# Allegro board CNC_Machine_Final_updated.brd
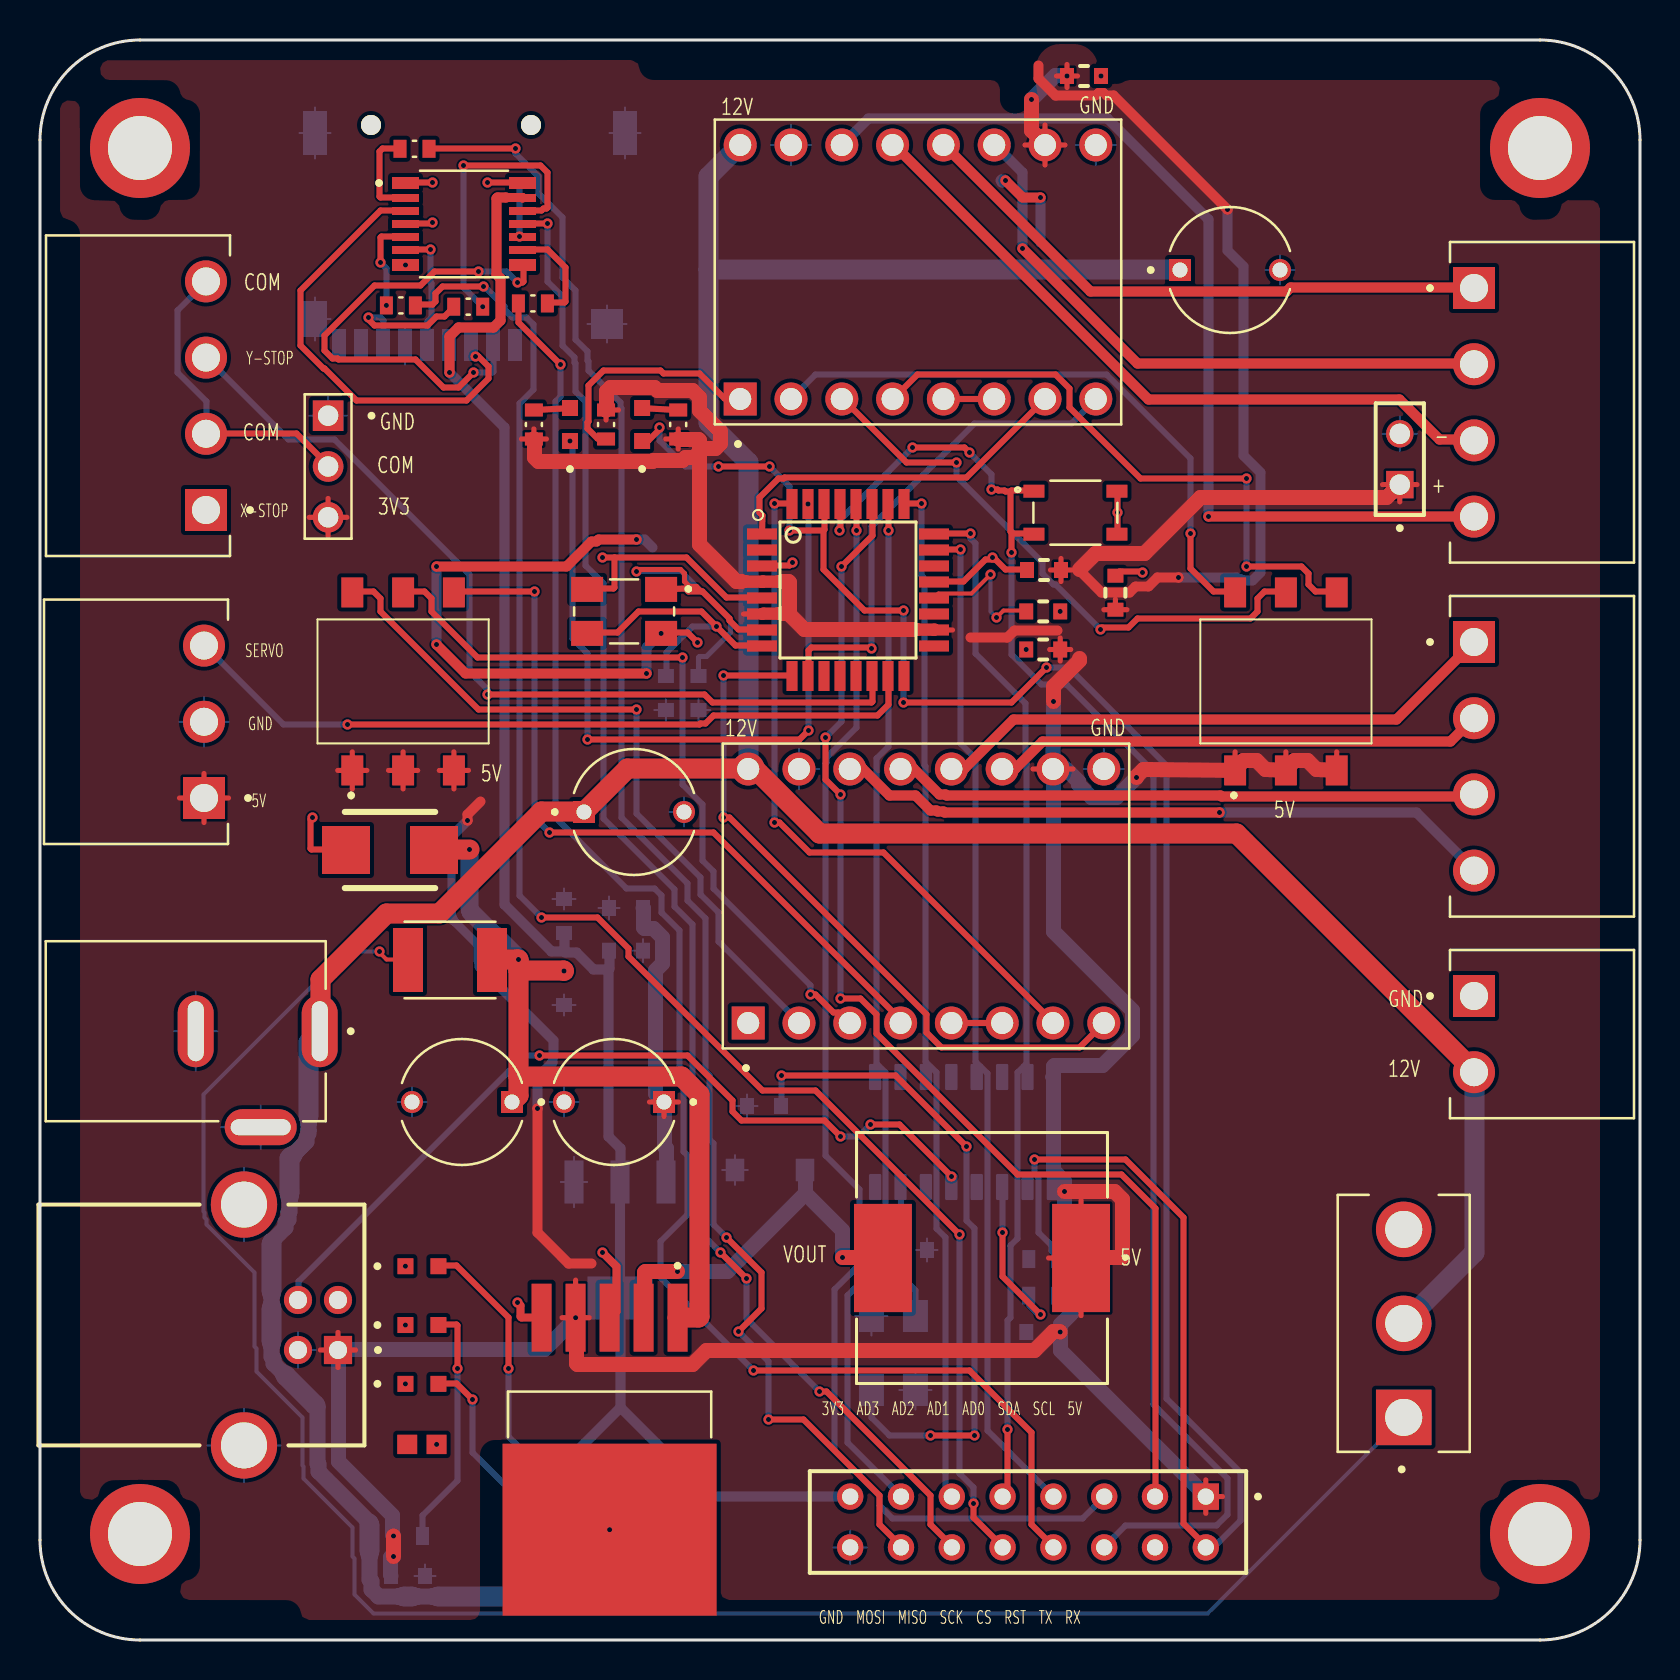
[diagram p0: board, top side]
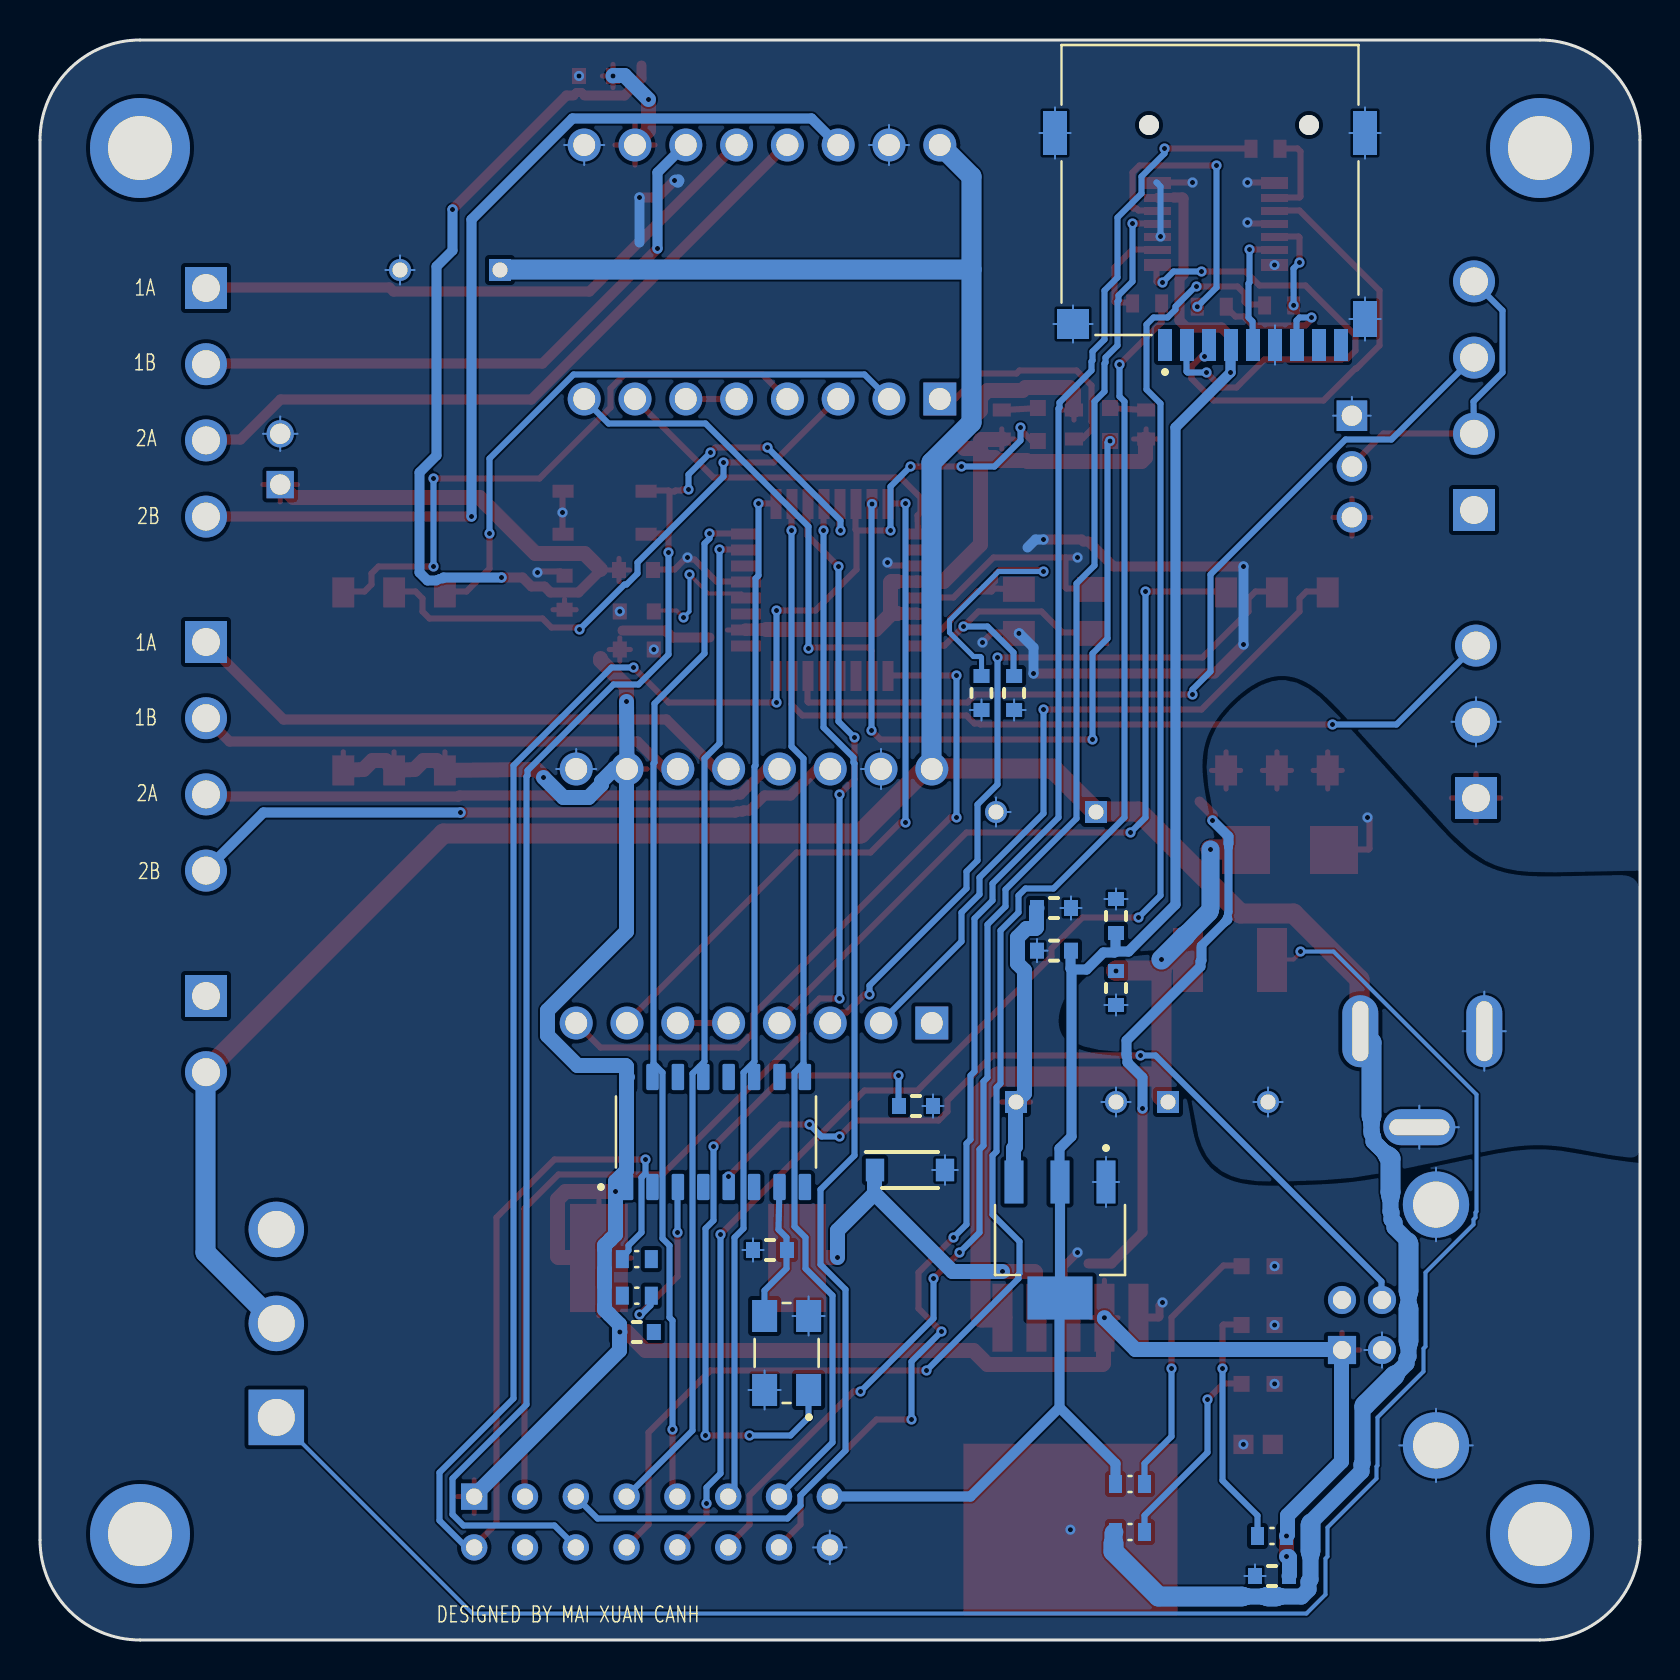
[diagram p1: board, bottom side, seen from below]

Outline 80 x 80 mm; copper layers: TOP, BOTTOM. Coordinates in mm from the lower left corner of the outline.
Outline path: 0,75 0,5 arc(1.46,1.46) 5,0 75,0 arc(78.54,1.46) 80,5 80,75 arc(78.54,78.54) 75,80 5,80 arc(1.46,78.54) 0,75

## Design rules (mm)
constraint set DEFAULT: min track width 0.1
net group USB: nets USB_D+ USB_D-
nets with their own width: min track width 0.254; nets 5V

## Placement (name value [footprint] x y rotation side)
C19  100nF  [WCAP-CSGP_0603_W]  18.4 3.2 180 bottom
C21  10uF  [WCAP-CSGP_0603_W]  26.2 36.2 270 bottom
C22  680uF/25V  [CAPPRD500W50D630H1120]  21.1 26.9 180 top
C23  10uF 0603  [WCAP-CSGP_0603_W]  26.2 32.6 90 bottom
C24  220uF/16V  [CAPPRD500W50D630H1120]  28.7 26.9 180 top
C25  10uF 0603  [WCAP-CSGP_0603_W]  29.3 36.6 0 bottom
C26  100nF  [WCAP-CSGP_0603_W]  29.3 34.47 180 bottom
C27  10uF 0603  [WCAP-CSGP_0603_W]  53.77 52.37 270 top
C28  100nF  0603  [WCAP-CSGP_0603_W]  50.16 49.52 0 top
C29  10uF 0603  [WCAP-CSGP_0603_W]  50.16 15.4 0 bottom
C30  22pF 0603  [WCAP-CSGP_0603_W]  36.2 26.7 0 bottom
C31  22pF 0603  [WCAP-CSGP_0603_W]  43.5 19.5 180 bottom
C32  47uF/50V  [CAPPRD500W50D630H1120]  59.5 68.5 0 top
C33  47uF/50V  [CAPPRD500W50D630H1120]  29.7 41.4 0 top
C34  100nF  [WCAP-CSGP_0603_W]  50.2 53.5 0 top
C35  100nF  [WCAP-CSGP_0603_W]  50.16 51.43 0 top
C36  22pF  [WCAP-CSGP_0603_W]  32.92 47.35 270 bottom
C37  22pF  [WCAP-CSGP_0603_W]  31.3 47.35 270 bottom
C38  100nF  [WCAP-CSGP_0603_W]  52.2 78.2 180 top
D2  0603  [LED_KP-1608SURCK]  19.09 18.69 0 top
D3  0603  [LED_KP-1608SURCK]  19.09 15.75 0 top
D4  0603  [LED_KP-1608SURCK]  19.09 12.81 0 top
D6  1N4007W-T  [SODFL3818X130N]  36.5 23.5 180 bottom
D10  TVS  [SMB_NOPOL]  17.5 39.5 0 top
D11  0603  [LED_KP-1608SURCK]  30.11 60.77 90 top
D12  0603  [LED_KP-1608SURCK]  26.5 60.77 90 top
F1  1812 16V 2.5A  [FUSER_MF-MSMF200]  20.5 34 0 top
FL4  BLM18SG121TN1D  [BEADC1608X65N]  19.09 9.78 0 top
J10  LIMIT SWITCH  [CUI_TBP02R1-381-04BE]  8.3 56.5 90 top
J13  USB_TYPEB  [SAMTEC_USBR-B-S-S-O-TH]  14.9 14.5 270 top
J15  TBP02R1-381-02BE  [CUI_TBP02R1-381-02BE]  71.7 32.2 270 top
J16  FFMD-08-X-X-X  [SAMTEC_IDMD-08-X-X]  49.4 5.9 180 top
J18  MSD-1-A  [CUI_MSD-1-A]  21.5 72.5 0 bottom
J20  X MOTOR  [CUI_TBP02R1-381-04BE]  71.7 49.9 270 top
J21  Y MOTOR  [CUI_TBP02R1-381-04BE]  71.7 67.6 270 top
J22  Z MOTOR  [CUI_TBP02R1-381-03BE]  8.2 42.1 90 top
J25  TMS-101-21-G-S  [SAMTEC_TMS-101-21-G-S]  75 5.3 0 top
J26  TMS-101-21-G-S  [SAMTEC_TMS-101-21-G-S]  5 74.6 0 top
J27  TMS-101-21-G-S  [SAMTEC_TMS-101-21-G-S]  5 5.3 0 top
J31  TMS-101-21-G-S  [SAMTEC_TMS-101-21-G-S]  75 74.6 0 top
J33  SELECT PIN  [TE_5-146281-3]  14.41 58.67 270 top
J34  FAN 5V  [SAMTEC_ESQ-102-48-L-S]  67.99 57.77 90 top
J35  PJ-035D  [CUI_PJ-035D]  13.98 30.44 270 top
L1  33uH  [IND_CDRH127LDNP-470MC_SUM]  47.1 19.1 180 top
NOREF  -  []  5 80 0 top
NOREF#2  -  []  0 5 90 top
R13  1k5  [RESC1508X55N]  25.5 7.8 0 bottom
R14  2k2  [RESC1508X55N]  18.4 5.2 180 bottom
R15  10K  [RESC1508X55N]  25.5 5.4 0 bottom
R16  1K  [RESC1508X55N]  31.91 60.77 270 top
R17  1K  [RESC1508X55N]  24.7 60.77 270 top
R18  1K  [RESC1508X55N]  50.16 19.05 0 bottom
R19  1K  [RESC1508X55N]  50.16 17.21 0 bottom
R20  10K  [RESC1508X55N]  28.3 60.77 90 top
R21  3K3  [RESC1508X55N]  18.73 74.56 0 top
R22  3K3  [RESC1508X55N]  18.05 66.73 0 top
R23  3K3  [RESC1508X55N]  24.64 66.83 180 top
R24  3K3  [RESC1508X55N]  21.41 66.66 180 top
S2  DIP3_X_254  [A6S3104H]  18.16 47.93 0 top
S3  DIP3_Y_254  [A6S3104H]  62.3 47.93 0 top
S4  4.2x3.3mm  [SW_SKRPACE010]  51.77 56.36 0 top
S5  SSP1S1M2  [SW_500SSP1S1M2REA]  68.19 15.83 90 top
U3  CH340G  [SOIC127P600X180-16N]  46.2 25.4 90 bottom
U4  ATMEGA328P-AN  [QFP80P900X900X120-32N]  40.4 52.5 0 top
U14  LM2596SX-12NOPB  [VREG_LM2596SX-12NOPB]  28.48 5.52 270 top
U15  A4988  [DRV8825]  44.3 37.2 90 top
U16  A4988  [DRV8825]  43.9 68.4 90 top
U17  74LVC125APW  [IC_74LVC125APW]  21.2 70.8 0 top
VR3  LM1117MPX-33NOPB  [VREG_LM1117MPX-33NOPB]  29 20 270 bottom
Y5  12Mhz 5032 4 pin  [XTAL_ECS-2712-10-30B-RWY-TR]  42.67 14.35 90 bottom
Y6  16Mhz 5032  [XTAL_ECS-2712-10-30B-RWY-TR]  29.2 51.43 180 top

## Library data of the parts
C19 C21 C23 C25-C31 C34-C38 = GRM033C71C104KE14J_0
C22 C24 C32 C33 = ECEA1EN470UB_0
D2-D4 D11 D12 = KP-1608SURCK
D6 = 1N4007W-T
D10 = ZENER_BIDI
F1 = MF-MSMF200
FL4 = BLM18SG121TN1D
J10 J20 J21 = TBP02R1-381-04BE
J13 = USBR-B-S-S-O-TH
J15 = TBP02R1-381-02BE
J16 = FFMD-08-X-X-X
J18 = MSD-1-A
J22 = TBP02R1-381-03BE
J25-J27 = TMS-101-21-G-S_2
J31 = TMS-101-21-G-S
J33 = 5-146281-3
J34 = ESQ-102-48-L-S
J35 = PJ-035D
L1 = IND
R13-R24 = 6-1879417-7
S2 S3 = A6S-3101-H
S4 = SKRPACE010
S5 = 500SSP1S1M2REA
U3 = CH340G
U4 = ATMEGA328P-AN
U14 = LM2596SX-12NOPB
U15 U16 = A4988
U17 = 74LVC125APW
VR3 = LM1117MPX-33NOPB
Y5 Y6 = ECS-2712-10-30B-RWY-TR

## Footprints (pads in the part's own frame, mm; a bottom-side part is the same pattern mirrored in y, then rotated)
A6S3104H
  rect 1.1x1.5 smd: 1(-2.54,-4.45) 2(-2.54,4.45) 3(0,-4.45) 4(0,4.45) 5(2.54,-4.45) 6(2.54,4.45)
BEADC1608X65N
  rect 1x0.97 smd: 1(-0.735,0) 2(0.735,0)
CAPPRD500W50D630H1120
  round 1.1 hole 0.75: N(2.5,0)
  rect 1.1x1.1 hole 0.75: P(-2.5,0)
CUI_MSD-1-A
  round 1 hole 1 unplated: (-4.95,-3.25) (3.05,-3.25)
  rect 0.7x1.6 smd: 1(2.25,7.75) 2(1.15,7.75) 3(0.05,7.75) 4(-1.05,7.75) 5(-2.15,7.75) 6(-3.25,7.75) 7(-4.35,7.75) 8(-5.45,7.75) CD(-6.55,7.75)
  rect 1.2x1.8 smd: G1(-7.75,6.45)
  rect 1.6x1.5 smd: G2(6.85,6.7)
  rect 1.2x2.2 smd: G3(-7.75,-2.85) G4(7.75,-2.85)
CUI_PJ-035D
  oval 3.6x1.8 hole 3x0.8: 1(0,0) 2(0,-6.2)
  oval 1.8x3.6 hole 0.8x3: 3(4.8,-2.95)
CUI_TBP02R1-381-02BE
  rect 2.1x2.1 hole 1.4: 1(0,0)
  round 2.1 hole 1.4: 2(3.81,0)
CUI_TBP02R1-381-03BE
  rect 2.1x2.1 hole 1.4: 1(0,0)
  round 2.1 hole 1.4: 2(3.81,0) 3(7.62,0)
CUI_TBP02R1-381-04BE
  rect 2.1x2.1 hole 1.4: 1(0,0)
  round 2.1 hole 1.4: 2(3.81,0) 3(7.62,0) 4(11.43,0)
DRV8825
  rect 1.65x1.65 hole 1.1: 1(-6.35,8.89)
  round 1.65 hole 1.1: 2(-6.35,6.35) 3(-6.35,3.81) 4(-6.35,1.27) 5(-6.35,-1.27) 6(-6.35,-3.81) 7(-6.35,-6.35) 8(-6.35,-8.89) 9(6.35,-8.89) 10(6.35,-6.35) 11(6.35,-3.81) 12(6.35,-1.27) 13(6.35,1.27) 14(6.35,3.81) 15(6.35,6.35) 16(6.35,8.89)
FUSER_MF-MSMF200
  rect 1.5x3.2 smd: 1(-2.1,0) 2(2.1,0)
IC_74LVC125APW
  rect 1.35x0.6 smd: 1(-2.925,2.05) 7(-2.925,-2.05) 8(2.925,-2.05) 14(2.925,2.05)
  rect 1.35x0.4 smd: 2(-2.925,1.3) 3(-2.925,0.65) 4(-2.925,0) 5(-2.925,-0.65) 6(-2.925,-1.3) 9(2.925,-1.3) 10(2.925,-0.65) 11(2.925,0) 12(2.925,0.65) 13(2.925,1.3)
IND_CDRH127LDNP-470MC_SUM
  rect 2.896x5.41 smd: 1(-4.953,0) 2(4.953,0)
LED_KP-1608SURCK
  rect 0.8x0.8 smd: 1(0.825,0) 2(-0.825,0)
QFP80P900X900X120-32N
  rect 1.5x0.55 smd: 1(-4.3,2.8) 2(-4.3,2) 3(-4.3,1.2) 4(-4.3,0.4) 5(-4.3,-0.4) 6(-4.3,-1.2) 7(-4.3,-2) 8(-4.3,-2.8) 17(4.3,-2.8) 18(4.3,-2) 19(4.3,-1.2) 20(4.3,-0.4) 21(4.3,0.4) 22(4.3,1.2) 23(4.3,2) 24(4.3,2.8)
  rect 0.55x1.5 smd: 9(-2.8,-4.3) 10(-2,-4.3) 11(-1.2,-4.3) 12(-0.4,-4.3) 13(0.4,-4.3) 14(1.2,-4.3) 15(2,-4.3) 16(2.8,-4.3) 25(2.8,4.3) 26(2,4.3) 27(1.2,4.3) 28(0.4,4.3) 29(-0.4,4.3) 30(-1.2,4.3) 31(-2,4.3) 32(-2.8,4.3)
RESC1508X55N
  rect 0.65x0.9 smd: 1(-0.725,0) 2(0.725,0)
SAMTEC_ESQ-102-48-L-S
  rect 1.37x1.37 hole 1.02: 01(0,0)
  round 1.37 hole 1.02: 02(2.54,0)
SAMTEC_IDMD-08-X-X
  rect 1.318x1.318 hole 0.81: 01(-8.89,-1.27)
  round 1.318 hole 0.81: 02(-8.89,1.27) 03(-6.35,-1.27) 04(-6.35,1.27) 05(-3.81,-1.27) 06(-3.81,1.27) 07(-1.27,-1.27) 08(-1.27,1.27) 09(1.27,-1.27) 10(1.27,1.27) 11(3.81,-1.27) 12(3.81,1.27) 13(6.35,-1.27) 14(6.35,1.27) 15(8.89,-1.27) 16(8.89,1.27)
SAMTEC_TMS-101-21-G-S
  round 5 hole 3.2: 03(0,0)
SAMTEC_USBR-B-S-S-O-TH
  rect 1.408x1.408 hole 0.9: 1(0,0)
  round 1.408 hole 0.9: 2(-2.5,0) 3(-2.5,-2) 4(0,-2)
  round 3.316 hole 2.3: S1(4.77,-4.7) S2(-7.27,-4.7)
SMB_NOPOL
  rect 2.4x2.4 smd: A(2.2,0) C(-2.2,0)
SODFL3818X130N
  rect 0.92x1.13 smd: 1(-1.75,0) 2(1.75,0)
SOIC127P600X180-16N
  custom 1.31x0.62 smd: 1(-2.75,4.445) 2(-2.75,3.175) 3(-2.75,1.905) 4(-2.75,0.635) 5(-2.75,-0.635) 6(-2.75,-1.905) 7(-2.75,-3.175) 8(-2.75,-4.445) 9(2.75,-4.445) 10(2.75,-3.175) 11(2.75,-1.905) 12(2.75,-0.635) 13(2.75,0.635) 14(2.75,1.905) 15(2.75,3.175) 16(2.75,4.445)
SW_500SSP1S1M2REA
  rect 2.775x2.775 hole 1.85: 1(-4.7,0)
  round 2.775 hole 1.85: 2(0,0) 3(4.7,0)
SW_SKRPACE010
  rect 1.05x0.65 smd: 1(-2.075,1.075) 2(2.075,1.075) 3(-2.075,-1.075) 4(2.075,-1.075)
TE_5-146281-3
  rect 1.53x1.53 hole 1.02: 1(-2.54,0)
  round 1.53 hole 1.02: 2(0,0) 3(2.54,0)
VREG_LM1117MPX-33NOPB
  rect 2.15x0.95 smd: 1(-2.9,2.3) 2(-2.9,0) 3(-2.9,-2.3)
  rect 2.15x3.25 smd: 4(2.9,0)
VREG_LM2596SX-12NOPB
  rect 3.4x1 smd: 1(-10.6,3.4) 2(-10.6,1.7) 3(-10.6,0) 4(-10.6,-1.7) 5(-10.6,-3.4)
  rect 8.6x10.7 smd: 6(0,0)
WCAP-CSGP_0603_W
  rect 0.7x0.8 smd: 1(-0.85,0) 2(0.85,0)
XTAL_ECS-2712-10-30B-RWY-TR
  rect 1.6x1.25 smd: 1(-1.85,-1.1) 2(1.85,-1.1) 3(1.85,1.1) 4(-1.85,1.1)

## Nets
3V3: C21.2 C26.2 J16.15 J18.4 R13.2 U17.13(VCC) VR3.2 VR3.4(VOUT_4)
5V: C19.2 C24.P C25.2 C27.2 C28.2 C29.2 C34.2 C38.2 J13.1(VCC) J16.01 J22.1 J33.3 J34.01 L1.1 R14.2 R16.2 R17.2 R20.2 S2.1 S2.3 S2.5 S3.1 S3.3 S3.5 U3.16 U4.4 U4.6(VCC#6) U4.18 U14.4 U15.10 U16.10 VR3.3
12V: C32.P C33.P J15.2 J35.1 R15.2 S5.2 U15.16(VMOT) U16.16(VMOT)
GND: C19.1 C21.1 C24.N C25.1 C26.1 C27.1 C28.1 C30.1 C31.1 C32.N C33.N C34.1 C35.2 C36.2 C37.2 C38.1 D2.2(C) D3.2(C) D4.2(C) D6.2 FL4.2 J13.4 J13.S1 J13.S2 J16.16 J18.6(VSS) J18.G1 J18.G2 J18.G3 J18.G4 J22.2 J33.1 J34.02 S4.2 S4.4 U3.1 U4.3 U4.5 U4.21 U14.3 U14.5 U14.6 U15.9 U15.15 U16.9 U16.15 U17.1 U17.4 U17.7 U17.10 U17.14 VR3.1 Y5.2 Y5.4 Y6.2 Y6.4
VIN: C22.P C23.2 D10.A F1.2 U14.1(VIN)
1A: J20.1 U15.12
1A_2: J21.1 U16.12
1B: J20.2 U15.11
1B_2: J21.2 U16.11
2A: J20.3 U15.13
2A_2: J21.3 U16.13
2B: J20.4 U15.14
2B_2: J21.4 U16.14
AD0: J16.07 U4.23
AD1: J16.09 U4.24
AD2: J16.11 U4.25
AD3: J16.13 U4.26
AD6: U4.19
AD7: U4.22
CS: J16.08 R23.2
CS_LLS: J18.2 U17.8
DI_LLS: J18.3 U17.3
DO_LLS: J18.7 R24.2
H_GND: C22.N C23.1 D10.C(2) FL4.1 J15.1 J35.2 J35.3
IO2: U4.32 U15.7
IO3: U4.1 U16.7
IO4: U4.2
IO5: U4.9 U15.8
IO6: U4.10 U16.8
IO7: U4.11
IO8: R20.1 U4.12 U15.1 U16.1
IO9: J10.1 U4.13
IO10: J10.3 U4.14
IO11: J22.3 U4.15
IO12: U4.16
IO13: U4.17
MISO: J16.12 U17.11
MOSI: J16.14 R21.2
MS1_X: S2.2 U15.2
MS1_Y: S3.2 U16.2
MS2_X: S2.4 U15.3
MS2_Y: S3.4 U16.3
MS3_X: S2.6(NO_3) U15.4
MS3_Y: S3.6(NO_3) U16.4
RST: J16.06 S4.1 S4.3 U4.29
SCK: J16.10 R22.2
SCK_LLS: J18.5 U17.6
SCL: J16.03 U4.27
SDA: J16.05 U4.28
USB_D+: J13.3 U3.5
USB_D-: J13.2 U3.6
USB_RX: D11.2(C) J16.02 R18.2 U4.30
USB_TX: D12.2(C) J16.04 R19.2 U4.31
VOUT: D6.1(K) L1.2 U14.2
XI: C31.2 U3.7 Y5.3(OUT/IN)
XO: C30.2 U3.8(XO) Y5.1
XTAL1: C36.1 U4.7 Y6.1
XTAL2: C37.1 U4.8 Y6.3(OUT/IN)
N159792: D2.1 R13.1
N159937: D3.1 R14.1
N160078: D4.1 R15.1
N168314: C29.1 U3.4
N169273: D11.1 R16.1
N169321: D12.1 R17.1
N170907: R19.1 U3.3
N170909: R18.1 U3.2
N174721: U15.5 U15.6
N176018: U16.5 U16.6
N177002: J10.2 J10.4 J33.2
N180451: C35.1 U4.20
N1623340: F1.1 S5.1
N2014051: R21.1 U17.2
N2014054: R22.1 U17.5
N2014058: R23.1 U17.9
N20140511: R24.1 U17.12

Pads without a net: J18 1 8 CD; J25 03; J26 03; J27 03; J31 03; S5 3; U3 9 10 11 12 13 14 15

## Via types
v1: diameter 0.508, hole 0.254, TOP to BOTTOM, 137 vias

## Routing (per net, layer and track width the routed paths; a pad name or vN(x,y) marks a point on that pad's centre or on a via; arc(x,y) is an arc through that point)
3V3: length 90.3
  TOP w0.449: U17.13 24.13,72.1 24.12,72.12 23.43,72.12
  TOP w0.452: 23.43,72.12 23.38,72.12
  TOP w0.464: 23.38,72.12 23.32,72.12
  TOP w0.488: 23.32,72.12 23.27,72.12
  TOP w0.508: 23.27,72.12 22.88,72.12 22.82,72.08 22.82,68.28 23.02,68.08 23.02,65.97 22.68,65.62 20.93,65.62 20.48,65.17 v1(20.48,63.38)
  BOTTOM w0.508: VR3.2 29,22.9 ; 29,22.9 29.02,22.98 29.02,24.57 28.43,25.18 28.43,33.52 ; 29,22.9 VR3.4 29,17.1 29.02,17.12 29.02,11.62 ; 26.23,34.42 26.23,35.33 C21.2 ; 26.23,34.42 26.27,34.38 26.82,34.38 27.68,33.52 28.43,33.52 ; 26.23,34.42 25.57,34.42 23.23,36.77 23.23,60.62 v1(20.48,63.38) 20.48,64.72 20.45,64.75 J18.4 ; 28.43,33.52 28.48,33.58 28.48,34.42 28.45,34.47 C26.2 ; J16.15 40.51,7.17 40.48,7.17 33.48,7.17 29.02,11.62 ; 29.02,11.62 26.23,8.82 R13.2
5V: length 353.6
  TOP w0.254: 43.77,50.5 U4.18 45.63,50.5 ; 37.03,51.3 U4.6 35.17,51.3 ; C28.2 51.54,49.52 ; C28.2 50.48,49.52 ; C28.2 51.01,50.1 ; C28.2 51.01,48.95 ; 50.43,19.1 L1.1 ; L1.1 52.05,21.98 ; L1.1 52.05,16.22 ; S2.3 18.88,43.48 ; S2.3 17.43,43.48 ; S2.3 18.16,44.41 ; S2.3 18.16,42.55 ; 50.82,78.2 v1(51.35,78.2) ; v1(51.35,78.2) 51.35,77.62 ; v1(51.35,78.2) 51.88,78.2 ; v1(51.35,78.2) 51.35,78.78 ; 6.97,42.1 J22.1 ; J22.1 8.2,40.87 ; J22.1 8.2,43.33 ; J22.1 9.43,42.1 ; 53.19,51.52 C27.2 ; C27.2 53.77,52.04 ; C27.2 54.35,51.52 ; 28.3,61 R20.2 ; R20.2 28.3,62 ; R20.2 28.93,61.5 ; 14.9,13.62 J13.1 ; J13.1 14.9,15.38 ; J13.1 15.78,14.5 ; J13.1 14.02,14.5 ; R17.2 24.7,60.55 ; R17.2 25.32,60.05 ; R17.2 24.7,59.55 ; R17.2 24.07,60.05 ; J16.01 59.13,7.17 ; J16.01 58.29,8.01 ; J16.01 58.29,6.33 ; C34.2 51.58,53.5 ; C34.2 50.52,53.5 ; C34.2 51.05,52.92 ; C34.2 51.05,54.08 ; R16.2 32.54,60.05 ; R16.2 31.91,60.55 ; R16.2 31.28,60.05 ; R16.2 31.91,59.55 ; 62.3,44.41 S3.3 61.57,43.48 ; 19.97,43.48 S2.5 ; S2.5 21.42,43.48 ; S2.5 20.7,44.41 ; S2.5 20.7,42.55 ; 14.41,55.19 J33.3 ; J33.3 13.46,56.14 ; J33.3 14.41,57.08 ; J33.3 15.35,56.14 ; S2.1 15.61,44.41 ; S2.1 15.61,42.55 ; S2.1 16.34,43.48 ; S2.1 14.89,43.48 ; 51.65,43.55 U15.10 49.65,43.55 ; 30.47,26.9 C24.P ; C24.P 31.93,26.9 ; C24.P 31.2,26.17 ; 26.78,14.24 v1(26.78,16.11) ; v1(26.78,16.11) 27.46,16.11 ; v1(26.78,16.11) 26.78,17.99 ; v1(26.78,16.11) 26.1,16.11 ; 37.03,52.9 U4.4 35.17,52.9 ; 59.75,44.41 S3.1 59.03,43.48 ; 64.11,43.48 S3.5 64.84,44.41 ; 67.99,56.91 J34.01 ; J34.01 68.85,57.77 ; J34.01 67.13,57.77 ; U16.10 50.25,75.75 ; U16.10 49.25,74.75 ; U16.10 51.25,74.75 ; U16.10 50.25,73.75
  TOP w0.449: 53.33,77.22 53.17,77.38 52.92,77.38 52.77,77.22
  TOP w0.492: 54.77,52.67 55.42,52.67
  TOP w0.5: v1(24.88,26.57) 24.88,20.38 26.43,18.82 27.57,18.82 ; 53.33,77.22 53.67,77.22 v1(59.38,71.53) ; 22.02,41.92 21.38,41.27 v1(21.38,40.98) ; 55.42,52.67 55.88,53.12 v1(56.92,53.12) ; 46.52,50.12 48.38,50.12 48.73,50.48 50.88,50.48 ; 54.77,52.67 54.48,52.38 53.08,52.38 52.02,53.42 ; 52.77,77.22 50.77,77.22 49.92,78.08 49.92,78.72
  TOP w0.6: U4.18 44.73,50.52 43.92,50.52 ; 36.88,52.92 36.17,52.92 U4.4 36.12,52.92 35.33,52.92 ; 36.88,51.33 36.17,51.33 U4.6
  TOP w0.601: 35.33,52.92 35.27,52.92 ; 36.92,51.33 36.88,51.33 ; 43.88,50.52 43.92,50.52 ; 36.88,52.92 36.92,52.92
  TOP w0.611: 36.92,52.92 36.98,52.92 ; 43.83,50.52 43.88,50.52 ; 36.98,51.33 36.92,51.33 ; 35.27,52.92 35.23,52.92
  TOP w0.63: 43.77,50.52 43.83,50.52 ; 35.23,52.92 35.17,52.92 ; 36.98,52.92 37.02,52.92 ; 37.02,51.33 36.98,51.33
  TOP w0.659: 43.73,50.52 43.77,50.52 ; 37.08,51.33 37.02,51.33 ; 37.02,52.92 37.08,52.92 ; 35.17,52.92 35.12,52.92
  TOP w0.696: 35.12,52.92 35.08,52.92 ; 37.08,52.92 37.12,52.92 ; 37.12,51.33 37.08,51.33 ; 43.67,50.52 43.73,50.52
  TOP w0.741: 35.08,52.92 35.02,52.92 ; 43.62,50.52 43.67,50.52 ; 37.17,51.33 37.12,51.33 ; 37.12,52.92 37.17,52.92
  TOP w0.75: R20.2 28.3,61.5 28.32,61.58 28.32,62.42 28.52,62.62 30.73,62.62 30.88,62.48 32.62,62.48 32.98,62.12 32.98,61.48 34.02,60.42 34.02,59.83 33.77,59.58 32.98,59.58 ; 37.48,51.27 38.23,50.52 43.62,50.52 ; 37.48,51.27 37.42,51.33 37.17,51.33 ; 37.48,51.27 37.48,52.88 37.42,52.92 37.17,52.92 ; J34.01 67.99,57.77 67.33,57.12 58.02,57.12 55.23,54.33 52.77,54.33 51.98,53.52 ; 32.98,59.58 32.98,59.98 32.92,60.02 31.98,60.02 31.91,60.05 R16.2 ; 32.98,59.58 32.98,59.17 ; L1.1 52.06,19.1 52.12,19.12 54.08,19.12 54.12,19.18 54.12,22.02 53.73,22.43 v1(51.23,22.43) ; R17.2 24.7,60.05 24.73,60.02 24.73,59.12 24.93,58.92 30.62,58.92 30.68,58.98 32.12,58.98 32.27,59.12 32.67,59.12 32.73,59.17 32.98,59.17 ; 32.98,59.17 32.98,54.77 34.83,52.92 35.02,52.92 ; S3.5 64.84,43.48 63.83,43.52 63.38,43.98 62.73,43.98 62.3,43.48 61.27,43.52 60.83,43.98 60.17,43.98 59.76,43.48 55.17,43.52 54.83,43.17 v1(54.83,43.12) ; v1(49.58,77.03) 49.58,75.47 50.23,74.83 U16.10 ; v1(50.67,46.92) 50.67,47.67 51.98,48.98 51.98,49.08 ; v1(26.78,16.11) 26.82,16.07 26.82,13.82 26.88,13.77 32.62,13.77 33.33,14.48 49.73,14.48 50.67,15.43 50.98,15.43 v1(51.01,15.4) ; v1(17.68,5.2) v1(17.68,4.17)
  BOTTOM w0.326: 20.57,36.38 20.62,36.33 20.62,36.27
  BOTTOM w0.347: 20.62,36.27 20.62,36.23
  BOTTOM w0.372: 20.62,36.23 20.62,36.17
  BOTTOM w0.4: 20.57,39.58 20.57,36.42
  BOTTOM w0.403: 20.57,39.62 20.57,39.58 ; 20.57,36.42 20.57,36.38 ; 20.62,36.17 20.62,36.12
  BOTTOM w0.407: 25.68,29.18 25.62,29.12 25.62,29.07
  BOTTOM w0.411: 20.57,39.67 20.57,39.62
  BOTTOM w0.425: 20.57,39.73 20.57,39.67
  BOTTOM w0.426: 25.62,29.07 25.62,29.02
  BOTTOM w0.433: 59.88,53.08 60.02,53.08 60.08,53.02
  BOTTOM w0.438: 20.62,36.12 20.62,36.08 ; 21.93,34.67 21.93,34.73 20.77,35.88
  BOTTOM w0.444: 20.57,39.77 20.57,39.73 ; 20.73,35.92 20.77,35.88
  BOTTOM w0.452: 25.62,29.02 25.62,28.98 ; 60.08,53.02 60.12,53.02 60.17,52.98
  BOTTOM w0.461: 20.68,35.98 20.73,35.92
  BOTTOM w0.468: 20.57,39.83 20.57,39.77
  BOTTOM w0.48: 20.62,36.08 20.62,36.02
  BOTTOM w0.485: 25.62,28.98 25.62,28.93
  BOTTOM w0.487: 20.62,36.02 20.68,35.98
  BOTTOM w0.491: 60.17,52.98 60.62,52.98 ; 25.68,29.27 25.68,29.18 ; 61.02,53.38 61.02,58.38
  BOTTOM w0.495: 25.68,29.32 25.68,29.27
  BOTTOM w0.498: 20.57,39.88 20.57,39.83
  BOTTOM w0.5: v1(59.38,71.53) 59.38,69.47 60.17,68.67 60.17,59.23 61.02,58.38 ; 60.62,52.98 61.02,53.38 ; 25.62,28.93 25.62,28.88 24.88,28.12 v1(24.88,26.57) ; 59.88,53.08 59.83,53.12 v1(56.92,53.12) ; 20.57,39.88 20.57,40.17 v1(21.38,40.98) ; 25.68,29.32 25.68,29.98 21.98,33.67 21.98,33.92 21.93,33.98 21.93,34.67
  BOTTOM w0.717: 51.62,19.88 51.58,19.93
  BOTTOM w0.718: 51.67,19.82 51.62,19.88
  BOTTOM w0.72: 51.58,19.93 51.52,19.98
  BOTTOM w0.729: 51.77,18.57 51.77,19.52 ; 51.77,16.73 51.77,17.68
  BOTTOM w0.73: 51.77,17.68 51.77,17.73
  BOTTOM w0.731: 51.58,16.32 51.62,16.38 ; 51.77,18.52 51.77,18.57 ; 51.77,19.52 51.77,19.57
  BOTTOM w0.732: 51.62,16.38 51.67,16.43 ; 51.77,16.68 51.77,16.73
  BOTTOM w0.734: 51.73,19.77 51.67,19.82
  BOTTOM w0.735: 51.52,16.27 51.58,16.32
  BOTTOM w0.737: 51.77,17.73 51.77,17.77
  BOTTOM w0.739: 51.52,19.98 51.48,20.02 ; 51.77,19.57 51.77,19.62 ; 51.77,18.48 51.77,18.52
  BOTTOM w0.742: 51.77,16.62 51.77,16.68
  BOTTOM w0.746: 51.67,16.43 51.73,16.48
  BOTTOM w0.75: v1(26.78,16.11) 26.77,16.07 25.23,14.52 14.98,14.52 J13.1 14.93,14.48 14.93,8.93 17.62,6.23 17.62,5.27 v1(17.68,5.2) ; 51.52,16.27 51.02,15.77 v1(51.01,15.4) 51.02,15.43 51.02,14.48 58.27,7.23 58.28,7.17 J16.01 ; C24.P 31.2,26.9 ; 31.2,26.9 30.77,27.32 30.77,33.48 31.12,33.83 31.12,35.12 30.68,35.58 30.23,35.58 30.18,35.62 30.18,36.58 C25.2 ; 31.2,26.9 31.23,26.88 31.23,24.68 31.32,24.57 31.32,22.98 31.3,22.9 VR3.3 ; 51.77,19.62 51.77,19.73 51.73,19.77 ; 51.77,17.77 51.77,18.48 ; v1(17.68,4.17) 17.57,4.17 17.52,4.12 17.52,3.27 C19.2 ; U15.10 50.67,43.52 50.67,35.42 54.62,31.48 54.62,30.23 53.12,28.73 50.73,28.73 50.67,28.68 50.67,28.23 50.65,28.15 U3.16 50.67,28.18 50.67,23.48 51.23,22.93 v1(51.23,22.43) 51.23,20.27 51.48,20.02 ; U15.10 v1(50.67,46.92) ; U15.10 51.27,43.58 51.92,42.92 51.92,42.77 52.58,42.12 53.83,42.12 v1(54.83,43.12) ; 51.73,16.48 51.77,16.52 51.77,16.62 ; v1(49.58,77.03) 50.77,78.22 51.33,78.22 v1(51.35,78.2)
12V: length 184.3
  TOP w1: J35.1 14.02,30.52 14.02,33.02 17.32,36.33 19.98,36.33 25.07,41.42 27.23,41.42 27.2,41.4 ; 27.2,41.4 27.27,41.48 29.38,43.58 35.38,43.58 U15.16 35.73,43.58 38.98,40.33 59.83,40.33 71.67,28.48 71.7,28.38 J15.2 ; 27.2,41.4 C33.P
  BOTTOM w0.701: 13.38,25.27 13.32,25.23 13.32,25.18
  BOTTOM w0.731: 13.32,25.18 13.32,25.12
  BOTTOM w0.764: 13.32,25.12 13.32,25.07
  BOTTOM w0.771: 13.43,25.32 13.38,25.27
  BOTTOM w0.776: 13.02,24.62 12.98,24.57
  BOTTOM w0.777: 12.98,24.57 12.93,24.52
  BOTTOM w0.779: 13.07,24.68 13.02,24.62
  BOTTOM w0.78: 13.43,25.68 13.43,25.57
  BOTTOM w0.781: 13.43,25.73 13.43,25.68
  BOTTOM w0.782: 12.93,24.52 12.88,24.48 ; 13.43,25.57 13.43,25.52
  BOTTOM w0.784: 13.43,25.77 13.43,25.73 ; R15.2 26.27,5.42 26.32,5.38
  BOTTOM w0.785: 11.62,14.12 11.68,14.07 11.68,14.02
  BOTTOM w0.787: 13.12,24.73 13.07,24.68
  BOTTOM w0.789: 13.43,25.52 13.43,25.48
  BOTTOM w0.792: 13.43,25.82 13.43,25.77
  BOTTOM w0.794: 12.88,24.48 12.82,24.43
  BOTTOM w0.798: 13.43,25.48 13.43,25.43
  BOTTOM w0.8: 18.82,2.17 19.68,2.17 ; 13.12,24.73 13.32,24.93 13.32,25.07 ; 12.18,13.32 11.68,13.82 11.68,14.02 ; 17.98,2.17 16.93,2.17 16.57,2.52 16.57,2.92 16.48,3.02 16.48,4.23 ; 16.48,5.88 13.93,8.43 13.93,8.77 13.88,8.82 13.88,11.62 13.82,11.68 ; 11.57,17.23 11.57,16.77 ; 12.82,24.43 12.73,24.32 ; 11.57,14.73 11.57,14.18 11.62,14.12 ; 11.57,19.93 12.27,20.62 12.27,20.88 12.43,21.02 12.43,21.38 12.48,21.43 12.48,22.07 ; 13.43,25.43 13.43,25.32
  BOTTOM w0.803: 13.43,25.88 13.43,25.82
  BOTTOM w0.817: 13.43,25.93 13.43,25.88
  BOTTOM w0.834: 13.43,25.98 13.43,25.93
  BOTTOM w0.854: 13.43,26.02 13.43,25.98
  BOTTOM w0.858: 18.77,2.17 18.82,2.17 ; 19.68,2.17 19.73,2.17 ; 17.98,2.17 18.02,2.17
  BOTTOM w0.868: 12.73,24.32 12.68,24.27 ; 26.32,5.33 26.32,5.38
  BOTTOM w0.87: 16.48,4.27 16.48,4.23 ; 11.57,14.77 11.57,14.73 ; 11.57,17.27 11.57,17.23 ; 12.48,22.12 12.48,22.07 ; 11.57,16.77 11.57,16.73
  BOTTOM w0.874: 19.73,2.17 19.77,2.17 ; 18.02,2.17 18.07,2.17 ; 18.73,2.17 18.77,2.17
  BOTTOM w0.877: 13.43,26.07 13.43,26.02
  BOTTOM w0.884: 16.48,5.88 16.48,5.83 ; 11.57,19.93 11.57,19.88
  BOTTOM w0.889: 12.48,22.18 12.48,22.12
  BOTTOM w0.898: 11.57,16.73 11.57,16.68 ; 11.57,14.82 11.57,14.77 ; 18.68,2.17 18.73,2.17 ; 19.77,2.17 19.82,2.17 ; 11.57,17.32 11.57,17.27 ; 13.77,11.73 13.82,11.68 ; 12.18,13.32 12.23,13.27 ; 18.07,2.17 18.12,2.17
  BOTTOM w0.9: 12.48,22.32 12.48,22.18 ; 12.23,13.27 12.27,13.23 ; 11.57,16.68 11.57,16.57 ; 18.62,2.17 18.68,2.17 ; 11.57,17.43 11.57,17.32 ; 16.48,4.42 16.48,4.27 ; 11.57,19.88 11.57,19.82 ; 26.32,4.88 26.32,5.33 ; 16.48,5.83 16.48,5.77 ; 18.12,2.17 18.18,2.17 ; 12.68,24.27 12.62,24.23 ; 19.82,2.17 19.88,2.17 ; 11.57,14.93 11.57,14.82
  BOTTOM w0.904: 13.43,26.12 13.43,26.07
  BOTTOM w0.934: 13.43,26.18 13.43,26.12
  BOTTOM w0.948: 12.62,24.23 12.57,24.18
  BOTTOM w0.965: 18.18,2.17 18.23,2.17 ; 19.88,2.17 19.93,2.17 ; 18.57,2.17 18.62,2.17
  BOTTOM w0.966: 13.43,26.23 13.43,26.18
  BOTTOM w0.967: 12.48,22.38 12.48,22.32
  BOTTOM w0.97: 11.57,16.57 11.57,16.52 ; 11.57,19.82 11.57,19.77 ; 16.48,5.77 16.48,5.73 ; 11.57,14.98 11.57,14.93 ; 16.48,4.48 16.48,4.42 ; 26.32,4.83 26.32,4.88 ; 11.57,17.48 11.57,17.43
  BOTTOM w0.992: 12.48,22.43 12.48,22.38
  BOTTOM w0.997: 12.57,24.18 12.52,24.12 ; 13.73,11.77 13.77,11.73
  BOTTOM w0.998: 12.27,13.23 12.32,13.18
  BOTTOM w1: 12.52,24.12 12.48,24.07 12.48,22.43 ; 13.43,26.23 13.43,29.88 J35.1 ; 33.42,68.53 33.42,60.88 35.42,58.88 35.42,43.62 U15.16 ; 33.42,68.53 56.98,68.53 57,68.5 C32.P ; 33.42,68.53 33.42,73.17 34.98,74.72 U16.16 ; 18.23,2.17 18.57,2.17 ; J15.2 71.7,28.38 71.72,28.38 71.72,19.38 68.28,15.93 68.18,15.83 S5.2 ; 12.32,13.18 13.73,11.77 ; 16.48,5.73 16.48,4.48 ; 26.32,4.83 26.32,4.42 24.07,2.17 19.93,2.17 ; 11.57,16.52 11.57,14.98 ; 11.57,19.77 11.57,17.48
GND: length 167.4
  TOP w0.305: U4.3 36.17,53.73 37.48,53.73 v1(37.62,53.88) ; 47.77,54.02 47.27,54.02 46.17,52.92 44.77,52.92 U4.21 ; 47.77,54.02 48.27,53.52 49.33,53.52 C34.1 ; 47.77,54.02 47.67,54.12 v1(47.62,54.12) ; 28.73,54.12 v1(28.12,54.12) ; 28.73,54.12 32.33,54.12 34.33,52.12 36.08,52.12 U4.5 ; 28.73,54.12 28.73,52.62 28.68,52.58 27.43,52.58 27.36,52.53 Y6.2 ; U17.14 24.13,72.85 24.12,72.88 v1(22.38,72.88) ; v1(19.62,70.88) 19.57,70.83 18.38,70.83 18.28,70.8 U17.4 ; v1(18.27,68.75) 18.28,68.75 ; v1(23.98,70.17) 24.13,70.15 U17.10 ; v1(32.88,49.88) 32.38,50.38 31.12,50.38 v1(31.05,50.33) ; v1(19.62,72.88) 18.38,72.88 18.28,72.85 U17.1 ; v1(55.12,53.38) 55.08,53.42 53.98,53.42 53.77,53.22 C27.1 ; S4.4 53.84,55.28 53.88,55.38 v1(53.88,56.38) 53.88,57.42 53.84,57.44 S4.2
  TOP w0.4: U14.5 25.08,16.11 25.07,16.12 24.07,16.12 24.02,16.18 24.02,16.73 v1(23.88,16.88) ; v1(28.12,19.38) 28.82,18.68 28.82,16.43 28.48,16.11 U14.3
  TOP w0.5: v1(50.02,72.12) 49.12,72.12 v1(48.27,72.97) ; v1(19.82,49.77) 21.27,48.33 v1(30.32,48.33) ; v1(29.82,55.02) 27.93,55.02 27.82,54.92 27.57,54.92 26.32,53.67 v1(19.82,53.67)
  BOTTOM w0.1: 28.45,36.02 C25.1 ; C25.1 28.98,36.6 ; C25.1 28.45,37.18 ; C25.1 27.92,36.6 ; J18.G2 29.33,65.8 ; J18.G2 28.35,66.73 ; J18.G2 28.35,64.87 ; J18.G2 27.37,65.8 ; 13.75,74.07 J18.G3 ; J18.G3 14.53,75.35 ; J18.G3 13.75,76.63 ; J18.G3 12.97,75.35 ; J18.G4 30.03,75.35 ; J18.G4 29.25,76.63 ; J18.G4 29.25,74.07 ; J18.G4 28.47,75.35 ; C21.1 26.78,37.05 ; C21.1 26.2,37.58 ; C21.1 25.62,37.05 ; C21.1 26.2,36.52 ; 18.25,65.73 J18.6 18.25,63.77 ; 10.2,23.61 J13.S2 10.2,19.93 ; J33.1 15.35,61.22 ; J33.1 14.41,62.16 ; J33.1 13.46,61.22 ; J22.2 9.43,45.91 ; J22.2 8.2,44.68 ; J22.2 6.97,45.91 ; J22.2 8.2,47.14 ; 34.82,26.7 C30.1 ; C30.1 35.35,27.28 ; C30.1 35.35,26.12 ; C30.1 35.88,26.7 ; 40.77,16.2 Y5.2 ; Y5.2 41.57,15.22 ; Y5.2 42.37,16.2 ; Y5.2 41.57,17.18 ; D6.2 35.39,23.5 ; D6.2 34.75,24.24 ; D6.2 34.75,22.76 ; D6.2 34.11,23.5 ; 43.82,19.5 C31.1 ; C31.1 44.35,20.08 ; C31.1 44.35,18.92 ; C31.1 44.88,19.5 ; 30.15,33.89 C26.1 ; C26.1 29.62,34.47 ; C26.1 30.15,35.05 ; 26.7,21.65 VR3.1 ; VR3.1 26.7,24.15 ; VR3.1 26.05,22.9 ; VR3.1 27.35,22.9 ; 31.3,45.97 C37.2 ; C37.2 30.72,46.5 ; C37.2 31.3,47.03 ; 37.55,73.75 U16.15 ; U16.15 37.55,75.75 ; U16.15 38.55,74.75 ; U16.15 36.55,74.75 ; 61.27,68.5 C32.N ; C32.N 62.73,68.5 ; C32.N 62,67.77 ; C32.N 62,69.23 ; J34.02 68.85,60.31 ; J34.02 67.99,59.45 ; J34.02 67.99,61.17 ; J34.02 67.13,60.31 ; J13.S1 12.04,9.73 ; J13.S1 10.2,11.57 ; J13.S1 10.2,7.89 ; J13.S1 8.36,9.73 ; 43.77,11.52 Y5.4 ; Y5.4 44.57,12.5 ; Y5.4 43.77,13.48 ; Y5.4 42.97,12.5 ; C19.1 19.78,3.2 ; C19.1 18.72,3.2 ; C19.1 19.25,3.78 ; 13.75,64.97 J18.G1 ; J18.G1 14.53,66.05 ; J18.G1 13.75,67.13 ; J18.G1 12.97,66.05 ; J16.16 41.35,4.63 ; J16.16 40.51,3.79 ; J16.16 40.51,5.47 ; J16.16 39.67,4.63 ; 25.47,26.9 C24.N ; C24.N 26.2,26.17 ; C24.N 26.93,26.9 ; C24.N 26.2,27.63 ; C33.N 32.2,42.13 ; C33.N 32.2,40.67 ; C33.N 31.47,41.4 ; U16.9 53.79,74.75 ; U16.9 52.79,73.75 ; U16.9 51.79,74.75 ; U15.9 53.19,44.55 ; U15.9 52.19,43.55 ; U15.9 54.19,43.55 ; C36.2 32.92,47.03 ; C36.2 33.5,46.5 ; C36.2 32.92,45.97 ; 12.9,13.62 J13.4 ; J13.4 12.9,15.38 ; J13.4 13.78,14.5 ; U15.15 38.95,43.55 ; U15.15 37.95,42.55 ; U15.15 37.95,44.55
  BOTTOM w0.305: U17.14 24.18,72.88 23.98,72.67 v1(23.98,70.17)
  BOTTOM w0.5: v1(19.82,49.77) v1(19.82,53.67) ; 30.62,54.62 30.23,55.02 v1(29.82,55.02) ; 48.23,73.03 48.08,73.03 48.02,72.97 ; 50.02,69.88 v1(50.02,72.12) ; 48.08,72.88 48.12,72.88 48.23,72.97 v1(48.27,72.97) ; v1(30.32,48.33) 30.32,49.62 31.02,50.33 v1(31.05,50.33)
  vias: v1(18.27,18.69) v1(18.27,15.75) v1(18.27,12.81) v1(19.83,9.78) v1(28.48,5.52) v1(49.31,49.52) v1(51.01,51.43) v1(53.05,78.2)
VIN: length 40.8
  TOP w1: 23.88,34.02 23.93,33.98 23.93,33.48 ; 23.88,34.02 22.68,34.02 F1.2 ; 23.88,34.02 v1(23.93,34.02) ; U14.1 31.88,16.11 31.98,16.12 32.92,16.12 32.98,16.18 32.98,27.27 32.08,28.18 23.93,28.18 ; 23.93,28.18 23.93,33.48 ; 23.93,28.18 23.93,27.23 23.6,26.9 C22.P ; 23.93,33.48 26.18,33.48 v1(26.2,33.45) ; D10.A 19.77,39.52 v1(21.48,39.52)
  BOTTOM w0.826: 21.48,36.52 21.48,36.48 21.52,36.42
  BOTTOM w0.846: 21.48,36.58 21.48,36.52
  BOTTOM w0.872: 21.48,36.62 21.48,36.58
  BOTTOM w0.9: v1(21.48,39.52) 21.48,36.62
  BOTTOM w0.911: 21.52,36.42 21.57,36.38
  BOTTOM w0.938: 21.57,36.38 22.62,35.33
  BOTTOM w0.944: 22.62,35.33 22.68,35.27
  BOTTOM w0.96: 22.68,35.27 22.73,35.23
  BOTTOM w0.987: 22.73,35.23 22.77,35.17
  BOTTOM w1: 22.77,35.17 v1(23.93,34.02)
1A: length 28.8
  TOP w0.508: U15.12 46.23,43.58 48.67,46.02 67.83,46.02 71.67,49.88 71.7,49.89 J20.1
1A_2: length 29.7
  TOP w0.508: J21.1 71.7,67.61 71.67,67.62 62.52,67.62 62.33,67.42 52.52,67.42 45.23,74.72 U16.12
1B: length 24.6
  TOP w0.508: J20.2 71.7,46.09 71.67,46.08 70.53,44.92 50.12,44.92 48.77,43.58 U15.11
1B_2: length 30.8
  TOP w0.508: J21.2 71.7,63.8 71.67,63.83 54.88,63.83 v1(49.12,69.58)
  BOTTOM w0.508: U16.11 47.77,74.72 49.12,73.38 v1(49.12,69.58)
2A: length 29.3
  TOP w0.508: J20.3 71.7,42.27 71.62,42.17 59.08,42.17 59.02,42.23 45.33,42.23 45.27,42.27 44.98,42.27 43.67,43.58 U15.13
2A_2: length 35.2
  TOP w0.508: J21.3 71.7,59.98 71.67,60.02 69.97,60.02 67.97,62.02 55.42,62.02 42.73,74.72 U16.13
2B: length 33.3
  TOP w0.508: v1(58.98,41.38) 45.23,41.38 45.17,41.42 44.88,41.42 44.83,41.48 44.52,41.48 43.77,42.23 42.48,42.23 41.12,43.58 U15.14
  BOTTOM w0.508: v1(58.98,41.38) 68.83,41.38 71.67,38.52 71.7,38.47 J20.4
2B_2: length 49.1
  TOP w0.508: J21.4 71.7,56.17 v1(58.42,56.17)
  BOTTOM w0.508: U16.14 40.17,74.83 41.42,76.08 53.38,76.08 58.42,71.03 v1(58.42,56.17)
AD0: length 50.6
  TOP w0.305: U4.23 44.77,54.52 v1(46.02,54.52)
  BOTTOM w0.305: J16.07 50.66,7.17 50.62,7.23 47.38,10.48 47.38,28.32 46.77,28.93 46.77,44.08 46.02,44.83 v1(46.02,54.52)
AD1: length 51.6
  TOP w0.305: U4.24 44.77,55.33 v1(46.52,55.33) ; v1(48.38,10.52) 48.38,7.42 48.12,7.17 J16.09
  BOTTOM w0.305: v1(46.52,55.33) 46.52,55.08 46.77,54.83 46.77,49.33 49.27,46.83 49.27,43.88 49.33,43.83 49.33,28.82 48.88,28.38 48.88,20.07 48.52,19.73 48.52,16.12 48.38,15.98 v1(48.38,10.52)
AD2: length 51.2
  TOP w0.305: U4.25 43.27,56.83 v1(44.08,56.83)
  BOTTOM w0.305: v1(44.08,56.83) 44.08,53.23 44.23,53.08 44.23,43.73 44.27,43.67 44.27,28.93 44.83,28.38 44.83,20.57 45.27,20.12 45.27,7.52 45.59,7.17 J16.11
AD3: length 52
  TOP w0.305: v1(42.42,55.48) 42.42,56.77 U4.26
  BOTTOM w0.305: v1(42.42,55.48) 42.42,44.67 41.83,44.08 41.83,28.82 42.27,28.38 42.27,20.68 41.73,20.12 41.73,18.57 40.38,17.23 40.38,9.88 43.02,7.23 43.05,7.17 J16.13
CS: length 81.8
  TOP w0.305: v1(35.67,13.48) 46.48,13.48 49.58,10.38 49.58,5.77 50.62,4.73 50.66,4.63 J16.08 ; v1(26.02,63.77) 23.93,65.88 23.93,66.83 23.91,66.83 R23.2
  BOTTOM w0.305: v1(26.02,63.77) 26.02,62.17 25.77,61.92 25.77,41.12 29.32,37.58 30.73,37.58 31.07,37.23 31.07,36.38 31.98,35.48 31.98,27.82 32.17,27.62 32.17,24.43 32.38,24.23 32.38,21.27 31.02,19.93 31.02,18.32 31.07,18.27 31.07,18.07 v1(35.67,13.48)
CS_LLS: length 24
  TOP w0.305: v1(21.93,68.42) 19.73,68.42 19.02,67.72 16.73,67.72 14.23,65.22 14.23,64.47 14.62,64.08 14.88,64.08 14.93,64.03 18.77,64.03 20.18,62.62 20.93,62.62 v1(21.68,63.38) ; U17.8 24.13,68.75 24.18,68.72 24.18,67.92 24.12,67.88 v1(23.88,67.88)
  BOTTOM w0.305: v1(23.88,67.88) 23.32,68.42 v1(21.93,68.42) ; J18.2 22.65,64.75 22.68,64.72 22.68,63.42 22.62,63.38 v1(21.68,63.38)
DI_LLS: length 22.1
  TOP w0.305: U17.3 18.28,71.45 18.27,71.47 17.02,71.47 13.02,67.47 13.02,64.72 14.18,63.58 14.23,63.58 15.82,61.98 21.32,61.98 22.43,63.08 22.43,63.67 21.93,64.17 v1(21.77,64.17)
DO_LLS: length 6.9
  TOP w0.305: v1(16.43,66.12) 16.43,66.03 16.73,65.72 19.38,65.72 19.82,66.17 20.23,66.17 20.68,66.62 20.68,66.66 R24.2
  BOTTOM w0.305: J18.7 17.15,64.75 17.18,64.83 17.18,65.97 17.02,66.12 v1(16.43,66.12)
H_GND: length 18.8
  TOP w0.305: D10.C 15.27,39.52 13.57,39.52 13.52,39.58 13.52,41.02 v1(13.62,41.12)
  BOTTOM w0.1: C23.1 26.2,32.28 ; C23.1 26.2,31.22 ; C23.1 26.78,31.75 ; C23.1 25.62,31.75 ; J35.2 7.78,32.42 ; J35.2 8.86,30.44 ; J35.2 7.78,28.46 ; J35.2 6.71,30.44 ; J35.3 11.04,26.72 ; J35.3 11.04,24.56 ; J35.3 9.06,25.64 ; C22.N 19.33,26.9 ; C22.N 18.6,26.17 ; C22.N 18.6,27.63 ; C22.N 17.87,26.9
IO2: length 34.9
  TOP w0.305: U15.7 50.62,30.93 42.17,39.38 38.48,39.38 36.98,40.88 v1(36.73,40.88) ; v1(36.73,56.83) 37.58,56.83 U4.32
  BOTTOM w0.305: v1(36.73,56.83) v1(36.73,40.88)
IO3: length 18.2
  TOP w0.305: U16.7 46.33,58.12 37.23,58.12 37.17,58.08 36.92,58.08 35.98,57.12 35.98,56.38 36.12,56.23 U4.1
IO5: length 35.4
  TOP w0.305: v1(34.17,41.12) 34.48,41.12 44.33,31.27 44.33,30.38 45.08,29.62 51.98,29.62 53.17,30.82 U15.8 ; U4.9 37.58,48.23 v1(34.17,48.23)
  BOTTOM w0.305: v1(34.17,48.23) v1(34.17,41.12)
IO6: length 24.5
  TOP w0.305: U4.10 38.42,48.27 38.42,49.48 38.58,49.62 41.52,49.62 v1(41.58,49.58)
  BOTTOM w0.305: U16.8 52.77,62.02 51.58,60.83 46.73,60.83 41.58,55.67 v1(41.58,49.58)
IO8: length 11.8
  TOP w0.305: R20.1 28.3,60.05 27.88,60.08 27.38,60.58 27.38,60.88 27.43,60.92 27.43,62.73 28.18,63.48 31.02,63.48 31.18,63.33 32.98,63.33 34.23,62.08 U16.1
IO10: length 44.8
  TOP w0.305: v1(22.38,47.27) 33.23,47.27 33.62,46.88 41.58,46.88 41.62,46.92 41.62,48.17 U4.14
  BOTTOM w0.305: J10.3 8.3,64.11 8.38,64.08 12.43,60.02 14.73,60.02 21.48,53.27 21.48,48.42 22.38,47.52 v1(22.38,47.27)
IO11: length 37.7
  TOP w0.305: U4.15 42.42,48.17 42.42,46.77 41.88,46.23 33.67,46.23 33.27,45.83 33.02,45.83 32.98,45.77 v1(15.38,45.77)
  BOTTOM w0.305: J22.3 8.27,49.67 12.18,45.77 v1(15.38,45.77)
MISO: length 76
  TOP w0.305: J16.12 45.59,4.63 45.58,4.73 44.52,5.77 44.52,7.23 39.33,12.43 v1(38.98,12.43) ; U17.11 24.13,70.8 24.23,70.83 v1(25.38,70.83) ; v1(34.02,19.38) v1(35.33,18.07)
  BOTTOM w0.305: v1(38.98,12.43) 35.33,16.07 v1(35.33,18.07) ; v1(25.38,70.83) 25.38,67.92 26.07,67.22 26.07,66.97 26.12,66.92 26.12,64.72 26.73,64.12 26.73,63.88 26.77,63.83 26.77,62.42 27.27,61.92 27.27,53.73 28.18,52.83 28.18,41.08 31.73,37.52 31.73,36.67 32.62,35.77 32.62,28.12 32.83,27.93 32.83,24.73 33.02,24.52 33.02,20.38 v1(34.02,19.38)
MOSI: length 84.2
  TOP w0.305: v1(36.42,11.02) 38.17,11.02 41.98,7.23 41.98,5.77 43.02,4.73 43.05,4.63 J16.14 ; R21.2 19.45,74.56 19.52,74.58 v1(23.77,74.58) ; v1(34.92,15.43) 36.08,16.57 36.08,18.38 v1(34.33,20.12)
  BOTTOM w0.305: v1(34.92,15.43) 36.42,13.93 v1(36.42,11.02) ; v1(23.77,74.58) 23.77,74.33 24.93,73.17 24.93,72.33 26.12,71.12 26.12,68.12 26.77,67.47 26.77,65.03 27.38,64.42 27.38,63.98 27.43,63.92 27.43,63.48 29.02,61.88 29.02,61.62 29.07,61.58 29.07,41.12 32.38,37.83 32.38,36.98 33.27,36.08 33.27,28.43 33.48,28.23 33.48,25.02 33.67,24.82 33.67,20.77 v1(34.33,20.12)
MS1_X: length 36.1
  TOP w0.305: S2.2 15.62,52.38 15.68,52.42 16.68,52.42 17.02,52.08 17.02,51.42 21.93,46.52 v1(29.82,46.52)
  BOTTOM w0.305: v1(29.82,46.52) 29.82,41.33 33.02,38.12 33.02,37.27 33.92,36.38 33.92,34.92 37.92,30.93 U15.2
MS1_Y: length 30.5
  TOP w0.305: v1(57.52,55.33) 57.52,53.58 58.67,52.42 59.73,52.42 59.76,52.38 S3.2
  BOTTOM w0.305: U16.2 38.77,63.27 53.33,63.27 57.52,59.08 v1(57.52,55.33)
MS2_X: length 37.8
  TOP w0.305: v1(32.12,49.12) 21.88,49.12 19.57,51.42 19.57,52.08 19.23,52.42 18.23,52.42 18.16,52.38 S2.4 ; v1(38.52,32.27) 38.77,32.27 39.67,31.38 39.92,31.38 U15.3
  BOTTOM w0.305: v1(38.52,32.27) 38.52,32.73 33.67,37.58 33.67,38.42 33.12,38.98 33.12,41.77 32.12,42.77 v1(32.12,49.12)
MS2_Y: length 28.9
  TOP w0.305: U16.3 40.17,62.02 43.33,58.88 v1(45.83,58.88) ; v1(53.02,50.52) 53.12,50.62 54.42,50.62 54.88,51.08 60.52,51.08 60.88,51.42 60.88,52.08 61.23,52.42 62.27,52.42 62.3,52.38 S3.4
  BOTTOM w0.305: v1(45.83,58.88) 45.83,58.17 50.12,53.88 50.12,53.33 50.67,52.77 50.77,52.77 v1(53.02,50.52)
MS3_X: length 38
  TOP w0.305: S2.6 20.7,52.38 20.77,52.42 v1(24.73,52.42) ; U15.4 43.08,30.98 33.67,40.38 v1(25.48,40.38)
  BOTTOM w0.305: v1(24.73,52.42) 24.73,41.12 v1(25.48,40.38)
MS3_Y: length 30.7
  TOP w0.305: v1(60.33,53.67) 63.08,53.67 63.42,53.33 63.42,52.77 63.77,52.42 64.83,52.42 64.84,52.38 S3.6 ; U16.4 42.73,62.12 43.88,63.27 50.77,63.27 51.48,62.58 51.48,61.62 55.02,58.08 v1(60.33,58.08)
  BOTTOM w0.305: v1(60.33,53.67) v1(60.33,58.08)
RST: length 78.9
  TOP w0.305: S4.3 49.69,55.28 49.67,55.33 48.62,55.33 48.58,55.38 ; 48.52,57.42 48.58,57.48 49.67,57.48 49.69,57.44 S4.1 ; 48.52,57.42 48.52,55.42 48.58,55.38 ; 48.52,57.42 48.27,57.42 48.23,57.48 47.92,57.48 47.88,57.52 v1(47.58,57.52) ; U4.29 40.02,56.77 40.02,55.52 v1(39.98,55.48) ; 48.58,55.38 v1(48.58,54.38) ; v1(43.62,59.62) 46.23,59.62 v1(46.48,59.38)
  BOTTOM w0.305: v1(47.58,57.52) 47.58,58.27 v1(46.48,59.38) ; J16.06 53.2,4.63 53.27,4.73 54.27,5.73 58.83,5.73 59.38,6.27 59.38,8.07 55.67,11.77 55.67,43.17 55.62,43.23 55.62,43.48 51.33,47.77 50.08,47.77 48.58,49.27 v1(48.58,54.38) ; v1(39.98,55.48) 39.98,55.98 v1(43.62,59.62)
SCK: length 82
  TOP w0.305: v1(22.18,67.67) 20.12,67.67 19.77,67.33 19.77,66.92 19.62,66.78 18.88,66.78 18.77,66.73 R22.2 ; J16.10 48.12,4.63 48.08,4.73 46.67,6.12 v1(46.67,6.83) ; v1(25.07,36.12) 27.88,36.12 29.43,34.58 29.43,34.17 36.12,27.48 38.77,27.48 v1(45.98,20.27)
  BOTTOM w0.305: v1(45.98,20.27) 45.98,8.32 46.67,7.62 v1(46.67,6.83) ; v1(25.07,36.12) 23.98,37.23 23.98,61.83 24.68,62.52 24.68,65.78 24.32,66.12 23.62,66.12 23.23,66.53 23.23,66.67 22.23,67.67 v1(22.18,67.67)
SCK_LLS: length 6.1
  TOP w0.305: v1(19.52,69.53) 18.38,69.53 18.28,69.5 U17.6
  BOTTOM w0.305: J18.5 19.35,64.75 19.38,65.92 19.57,66.12 19.57,67.83 19.52,67.88 v1(19.52,69.53)
SCL: length 61.1
  TOP w0.305: U4.27 41.62,56.77 41.62,55.23 v1(40.08,53.67) ; v1(40.02,42.27) 39.27,43.02 v1(39.27,45.12) ; v1(40.02,32.08) 41.02,32.08 41.83,31.27 41.83,30.32 48.88,23.27 54.08,23.27 55.77,21.57 55.77,7.23 55.74,7.17 J16.03
  BOTTOM w0.305: v1(39.27,45.12) 40.08,45.92 v1(40.08,53.67) ; v1(40.02,42.27) v1(40.02,32.08)
SDA: length 64.8
  TOP w0.305: U4.28 40.83,56.77 v1(40.83,55.48)
  BOTTOM w0.305: J16.05 53.2,7.17 53.17,7.12 52.12,6.08 42.62,6.08 41.98,6.73 41.98,7.23 39.73,9.48 39.73,17.52 40.98,18.77 40.98,22.52 39.27,24.23 39.27,43.83 39.33,43.88 39.33,44.12 40.83,45.62 v1(40.83,55.48)
USB_D+: length 42.1
  TOP w0.305: v1(40.02,25.18) 39.23,25.98 35.08,25.98 34.62,26.43 34.62,26.98 32.38,29.23 v1(24.98,29.23) ; v1(41.52,25.77) 42.98,25.77 v1(45.58,23.18)
  BOTTOM w0.305: v1(24.98,29.23) 24.23,29.23 12.93,17.93 12.93,17.07 J13.3 ; v1(40.02,25.18) 40.92,25.18 v1(41.52,25.77) ; v1(45.58,23.18) 45.58,22.73 45.57,22.65 U3.5
USB_RX: length 114.5
  TOP w0.305: U4.30 39.23,56.77 39.23,55.52 39.17,55.48 ; 39.17,55.48 39.17,53.52 41.23,51.48 v1(43.17,51.48) ; 39.17,55.48 v1(37.48,55.48) ; v1(50.33,48.62) 48.58,46.88 v1(43.17,46.88) ; v1(30.98,60.62) 30.98,60.52 30.43,59.98 30.11,59.95 D11.2 ; v1(36.48,58.67) v1(33.92,58.67) ; J16.02 58.28,4.63 58.27,4.73 57.17,5.83 57.17,21.12 54.27,24.02 v1(49.73,24.02)
  BOTTOM w0.305: v1(30.98,60.62) 30.98,59.98 32.27,58.67 v1(33.92,58.67) ; v1(37.48,55.48) 37.48,57.67 v1(36.48,58.67) ; v1(49.73,24.02) 49.73,23.32 49.92,23.12 49.92,20.38 50.58,19.73 50.58,19.48 50.88,19.05 R18.2 ; J16.02 58.28,4.63 58.73,4.67 60.02,5.98 60.02,8.38 56.33,12.07 56.33,43.73 51.42,48.62 v1(50.33,48.62) ; v1(43.17,51.48) v1(43.17,46.88)
USB_TX: length 37.9
  TOP w0.305: v1(27.38,45.02) 37.98,45.02 v1(38.42,45.48)
  BOTTOM w0.305: v1(26.5,59.95) 26.57,59.92 26.62,59.88 26.62,50.08 27.38,49.33 v1(27.38,45.02) ; v1(38.4,56.8) 38.42,56.77 v1(38.42,45.48)
VOUT: length 19.2
  TOP w0.75: 42.15,19.1 42.15,19.1 42.12,19.12 v1(40.12,19.12) ; v1(31.88,18.43) 30.27,18.43 30.23,18.38 30.23,16.18 30.18,16.11 U14.2
  BOTTOM w0.75: D6.1 38.27,23.48 38.27,22.32 ; 38.27,22.32 34.38,18.43 v1(31.88,18.43) ; 38.27,22.32 40.12,20.48 v1(40.12,19.12)
XI: length 7.1
  BOTTOM w0.305: 43.02,22.65 43.03,22.65 43.08,20.52 42.67,20.12 42.67,19.57 C31.2 42.67,19.48 42.67,18.57 43.77,17.48 43.77,16.2 Y5.3
XO: length 33.8
  TOP w0.305: v1(46.73,10.23) v1(44.52,10.23) ; v1(37.08,28.23) 42.77,28.23 v1(46.33,24.68)
  BOTTOM w0.305: C30.2 37.08,26.77 v1(37.08,28.23) ; Y5.1 41.57,12.5 41.58,12.48 41.58,11.12 42.48,10.23 v1(44.52,10.23) ; v1(46.33,24.68) 46.33,20.98 46.73,20.57 v1(46.73,10.23)
XTAL1: length 19.3
  TOP w0.254: 33.08,52.42 32.83,52.67 32.48,52.67 32.23,52.92 32.23,53.33 32.02,53.52 29.93,53.52 v1(29.82,53.42)
  TOP w0.305: U4.7 36.08,50.52 34.92,50.52 34.48,50.98 34.48,51.08 33.12,52.42 32.42,52.42 32.27,52.58 31.06,52.53 Y6.1
  BOTTOM w0.254: C36.1 32.92,48.2 32.92,49.12 32.98,49.17 33.33,49.17 34.52,50.38 34.52,50.98 32.08,53.42 v1(29.82,53.42)
XTAL2: length 14.1
  TOP w0.305: Y6.3 27.36,50.33 27.43,50.38 28.88,50.38 29.93,51.42 33.08,51.42 v1(33.83,50.67) 34.77,49.73 36.08,49.73 U4.8
  BOTTOM w0.305: C37.1 31.29,48.2 31.32,48.27 31.32,49.38 32.62,50.67 v1(33.83,50.67)
N159792: length 13.5
  TOP w0.305: D2.1 19.91,18.69 19.98,18.73 20.82,18.73 23.43,16.12 v1(23.43,13.57)
  BOTTOM w0.305: v1(23.43,13.57) 23.43,10.18 24.77,8.82 R13.1
N159937: length 12.2
  TOP w0.305: D3.1 19.91,15.75 19.98,15.77 20.82,15.77 20.88,15.73 v1(20.88,13.57)
  BOTTOM w0.305: v1(20.88,13.57) 20.88,7.98 19.12,6.23 R14.1
N160078: length 10
  TOP w0.305: v1(21.62,12.02) 20.82,12.82 19.98,12.82 19.91,12.81 D4.1
  BOTTOM w0.305: R15.1 24.77,6.23 21.62,9.38 v1(21.62,12.02)
N169273: length 1.8
  TOP w0.305: D11.1 30.11,61.59 31.91,61.5 R16.1
N169321: length 1.8
  TOP w0.305: D12.1 26.5,61.59 24.7,61.5 R17.1
N170907: length 8.4
  TOP w0.305: v1(48.12,20.38) 48.12,18.18 v1(50.02,16.27)
  BOTTOM w0.305: v1(50.02,16.27) 49.92,16.27 49.48,16.73 49.48,17.18 49.44,17.21 R19.1 ; v1(48.12,20.38) 48.12,22.62 48.11,22.65 U3.3
N174721: length 2.5
  TOP w0.305: U15.5 U15.6
N176018: length 2.5
  TOP w0.305: U16.5 U16.6
N177002: length 15.6
  TOP w0.305: J33.2 14.41,58.68 14.38,58.77 12.82,60.33 8.38,60.33 8.3,60.3 J10.2
  BOTTOM w0.305: J10.4 8.3,67.92 8.27,67.88 6.88,66.47 6.88,63.38 8.32,61.92 8.3,60.3 J10.2
N180451: length 7.2
  TOP w0.2: v1(47.83,51.12) 48.17,51.48 49.27,51.48 C35.1 ; U4.20 44.92,52.33 46.58,52.33 v1(47.52,53.27)
  BOTTOM w0.2: v1(47.52,53.27) 47.52,51.42 v1(47.83,51.12)
N1623340: length 98.5
  TOP w0.2: v1(16.98,34.42) 16.98,34.38 17.32,34.02 18.43,34.02 F1.1
  BOTTOM w0.2: S5.1 68.17,11.12 58.38,1.33 16.68,1.33 15.73,2.27 15.73,4.08 15.62,4.17 15.62,5.62 13.18,8.07 13.18,8.68 13.12,8.73 13.12,11.12 10.82,13.43 10.82,14.57 10.73,14.68 10.73,18.38 8.32,20.77 8.32,21.02 8.23,21.12 8.23,21.38 8.18,21.43 8.18,27.27 15.32,34.42 v1(16.98,34.42)
N2014051: length 4.7
  TOP w0.305: R21.1 18,74.56 17.98,74.58 17.12,74.58 16.98,74.42 16.98,72.17 17.02,72.12 18.27,72.12 18.28,72.1 U17.2
N2014054: length 4.8
  TOP w0.305: U17.5 18.28,70.15 18.27,70.17 17.07,70.17 17.02,70.12 v1(17.02,68.88)
  BOTTOM w0.305: v1(17.02,68.88) 17.32,68.58 v1(17.32,66.73)
N2014058: length 5.2
  TOP w0.305: U17.9 24.13,69.5 24.23,69.53 25.38,69.53 26.27,68.62 26.27,66.92 26.23,66.88 25.43,66.88 25.37,66.83 R23.1
N20140511: length 14.9
  TOP w0.305: U17.12 24.13,71.45 24.23,71.47 25.07,71.47 25.18,71.58 25.32,71.58 25.38,71.62 25.38,73.38 25.02,73.72 v1(21.18,73.72) ; v1(22.14,66.66) 22.14,66.66
  BOTTOM w0.305: v1(21.18,73.72) 21.18,67.62 v1(22.14,66.66)

## Copper pours and planes (outline as drawn; the poured copper is in the pictures)
5V on TOP: outline of 490 points within 1,1 78,79.6
GND on BOTTOM: outline of 86 points within 0,0 80,80
H_GND on BOTTOM: outline of 89 points within 0,22.92 28.86,47.99

## Text on the board
Ref Des/Silkscreen Bottom: DESIGNED BY MAI XUAN CANH | 2B | 2A | 1A | 1B
Ref Des/Silkscreen Top: X-STOP | SERVO | Y-STOP | GND | 5V | GND  MOSI  MISO  SCK  CS  RST  TX  RX | 3V3  AD3  AD2  AD1  AD0  SDA  SCL  5V | COM | 3V3 | 12V | VOUT | + | -
XSECTION_CHART: *  SURFACE | L1 TOP CONDUCTOR | *  DIELECTRIC | L2 BOTTOM CONDUCTOR | DESIGN CROSS SECTION CHART | ___________________________ | TOTAL THICKNESS 0.26416 MM | 1-2
User.7: FIGURE | FINISHED_SIZE | 0.3048 | 0.508 | 0.75 | 0.81 | 0.9 | 1.02 | 1.1 | 1.4 | 1.85 | 2.3 | 3.2 | 1.0 | 3.0x0.8 | DRILL CHART: TOP to BOTTOM | ALL UNITS ARE IN MILLIMETERS | ROTATION | - | 90.000 | 0.000 | PLATED | NON-PLATED | QTY | 704 | 2 | 8 | 16 | 4 | 5 | 32 | 17 | 3 | 1
